# Altium PCB Eth_PoE.PcbDoc (part 2 of 3)
Units mm, origin at the board's own origin, x right, y up, seen from the top; angles counter-clockwise.
Board outline 33 x 53 mm, 2 copper layers (Top Layer, Bottom Layer), stack 0.97 mm thick; 81 components, 62 nets, 294 pads, 109 vias.
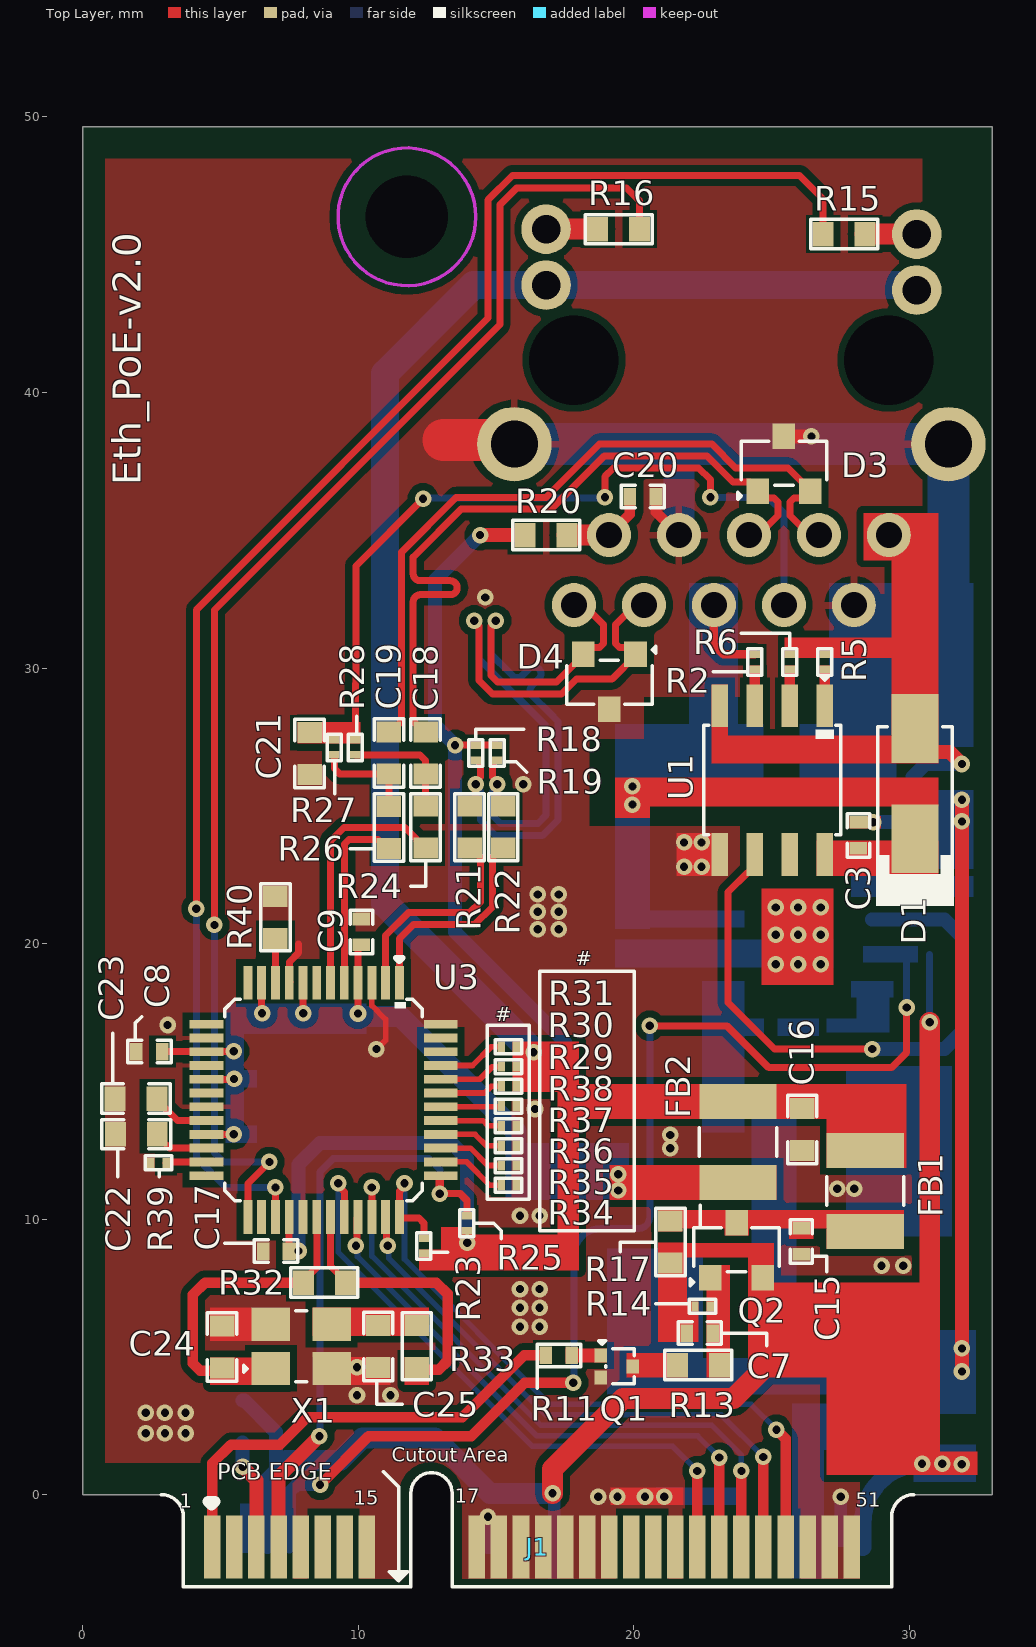
[diagram p0: Top Layer view]

## Part data (continued)
R13: library part RC0603FR-071KL, "RES SMD 1K OHM 1% 1/10W 0603", Case Code (Imperial)=0603, Case Code (Metric)=1608, LCSC Part Number=C22548, Manufacturer=Yageo, Max Operating Temperature=155°C, Min Operating Temperature=-55°C, Power Rating=100mW, Resistance=1kR, Supplier Part Number 1=311-1.00KHRDKR-ND, Temperature Coefficient=100ppm/°C, Tolerance=1%, Voltage Rating=50V, Case/Package=0603, ComponentLink1Description=https://www.verical.com/server-webapp/html/getDatasheet?partID=409289&src-supplier=Verical, ComponentLink1URL=https://www.verical.com/server-webapp/html/getDatasheet?partID=409289&src-supplier=Verical, ComponentLink2Description=http://documents.rs-components.com/techlib://itc_doclist_GB.htm?stockno=5048928&src-supplier=RSComponents, ComponentLink2URL=http://documents.rs-components.com/techlib://itc_doclist_GB.htm?stockno=5048928&src-supplier=RSComponents, ComponentLink3Description=http://www.yageo.com/documents/recent/PYu-RC0603_51_RoHS_L_4.pdf?src-supplier=Avnet+Europe, ComponentLink3URL=http://www.yageo.com/documents/recent/PYu-RC0603_51_RoHS_L_4.pdf?src-supplier=Avnet+Europe, ComponentLink4Description=http://www.farnell.com/datasheets/2167052.pdf?src-supplier=Element14, ComponentLink4URL=http://www.farnell.com/datasheets/2167052.pdf?src-supplier=Element14, ComponentLink5Description=http://www.farnell.com/datasheets/1868787.pdf?src-supplier=Element14, ComponentLink5URL=http://www.farnell.com/datasheets/1868787.pdf?src-supplier=Element14, ComponentLink6Description=http://www.yageo.com/documents/recent/PYu-RC_Group_51_RoHS_L_2.pdf?src-supplier=Avnet, ComponentLink6URL=http://www.yageo.com/documents/recent/PYu-RC_Group_51_RoHS_L_2.pdf?src-supplier=Avnet, ComponentLink7Description=https://www.verical.com/server-webapp/html/getDatasheet?partID=404327&src-supplier=Verical, ComponentLink7URL=https://www.verical.com/server-webapp/html/getDatasheet?partID=404327&src-supplier=Verical, ComponentLink8Description=http://www.farnell.com/datasheets/443971.pdf?src-supplier=Element14, ComponentLink8URL=http://www.farnell.com/datasheets/443971.pdf?src-supplier=Element14, Composition="Thick Film", Contact Plating=Tin,Matte, Depth=0.8mm, Height=0.45mm, Item Type=Resistor, Lead Free="Lead Free", Length=1.6mm, Manufacturer Part Number=RC0603FR-071KL, Military Standard=Not, Packaging="Tape and Reel", Pricing 1="1=0.1, 10=0.023, 100=0.0094, 1000=0.0042, 2500=0.0037 (USD)", Radiation Hardening=No, REACH SVHC="No SVHC", Stock 1=21472395, Supplier 1=Digi-Key, Termination=SMD/SMT
R15 R16: library part RC0603JR-07330RL, "RES  SMD 330R 100 mW 0603", Case Code (Imperial)=0603, Case Code (Metric)=1608, LCSC Part Number=C105879, Manufacturer=Yageo, Max Operating Temperature=155°C, Max Power Dissipation=100mW, Min Operating Temperature=-55°C, Package Quantity=5000, Resistance Tolerance=5%, Resistor Type="Thick Film", Supplier Part Number 1=311-330GRCT-ND, Temperature Coefficient=100ppm/°C, Voltage Rating=50V, Case/Package=0603, Category="Chip SMD Resistors", Construction=Rectangular, Depth=0.8mm, Features="Moisture Resistant", Height=0.45mm, Item Type=Resistor, Lead Free="Lead Free", Length=1.6mm, Manufacturer Part Number=RC0603JR-07330RL, Military Standard=Not, Number of Pins=2, Number of Terminations=2, Packaging="Tape and Reel", Power Rating=100mW, Pricing 1="1=0.10000, 10=0.02000, 100=0.00800, 1000=0.00360, 2500=0.00312 (USD)", REACH SVHC="No SVHC", Resistance=330R, RoHS=Yes, RoHS Compliant=Yes, Series=RC, Size Code=0603, Stock 1=1074593, Supplier 1=Digi-Key, Termination=SMD/SMT, Tolerance=5%, Voltage Rating (DC)=50V, Width=0.8mm
R18 R19 R27 R28: library part RC0201FR-0749R9L, "RES SMD 49.9 OHM 1% 1/20W 0201", Case Code (Imperial)=0201, Case Code (Metric)=0603, LCSC Part Number=C155744, Manufacturer=Yageo, Max Operating Temperature=125°C, Max Power Dissipation=50mW, Min Operating Temperature=-55°C, Resistor Type="Thick Film", Temperature Coefficient=200ppm/°C, Tolerance=1%, Voltage Rating=25V, Case/Package=0201, Category="Chip SMD Resistors", ComponentLink1Description=http://www.yageo.com/documents/recent/PYu-RC0201_51_RoHS_L_(8).pdf?src-supplier=Mouser, ComponentLink1URL=http://www.yageo.com/documents/recent/PYu-RC0201_51_RoHS_L_(8).pdf?src-supplier=Mouser, ComponentLink2Description=http://www.yageo.com/documents/recent/PYu-RC0201_51_RoHS_L_(8).pdf?src-supplier=Future+Electronics, ComponentLink2URL=http://www.yageo.com/documents/recent/PYu-RC0201_51_RoHS_L_(8).pdf?src-supplier=Future+Electronics, ComponentLink3Description=http://www.yageo.com/documents/recent/PYu-RC_Group_51_RoHS_L_10.pdf?src-supplier=Digi-Key, ComponentLink3URL=http://www.yageo.com/documents/recent/PYu-RC_Group_51_RoHS_L_10.pdf?src-supplier=Digi-Key, ComponentLink4Description=http://www.yageo.com/documents/recent/PYu-RC_Group_51_RoHS_L_9.pdf?src-supplier=Digi-Key, ComponentLink4URL=http://www.yageo.com/documents/recent/PYu-RC_Group_51_RoHS_L_9.pdf?src-supplier=Digi-Key, Construction=Rectangular, Depth=0.3mm, Features="Moisture Resistant", Height=0.01inch, Item Type=Resistor, Lead Free="Lead Free", Length=0.6mm, Manufacturer Part Number=RC0201FR-0749R9L, Military Standard=Not, Number of Terminations=2, Packaging="Tape and Reel", Power Rating=50mW, Pricing 1="10000=0.00128 (USD)", Resistance=49.9R, RoHS=Yes, RoHS Compliant=Yes, Series=RC, Size Code=0201, Stock 1=1020000, Supplier 1=Avnet, Supplier Part Number 1=RC0201FR-0749R9L, Termination=SMD/SMT, Width=0.012inch
R20: library part RC0603FR-0710RL, "RES SMD 10 OHM 1% 1/10W 0603", Case Code (Imperial)=0603, Case Code (Metric)=1608, LCSC Part Number=C109318, Manufacturer=Yageo, Max Operating Temperature=155°C, Min Operating Temperature=-55°C, Power Rating=100mW, Supplier Part Number 1=311-10.0HRDKR-ND, Temperature Coefficient=200ppm/°C, Tolerance=1%, Voltage Rating=50V, Case/Package=0603, ComponentLink1Description=http://www.farnell.com/datasheets/1868787.pdf?src-supplier=Element14, ComponentLink1URL=http://www.farnell.com/datasheets/1868787.pdf?src-supplier=Element14, ComponentLink2Description=http://www.yageo.com/documents/recent/PYu-RC0603_51_RoHS_L_4.pdf?src-supplier=Avnet, ComponentLink2URL=http://www.yageo.com/documents/recent/PYu-RC0603_51_RoHS_L_4.pdf?src-supplier=Avnet, ComponentLink3Description=http://documents.rs-components.com/techlib://itc_doclist_GB.htm?stockno=5048984&src-supplier=RSComponents, ComponentLink3URL=http://documents.rs-components.com/techlib://itc_doclist_GB.htm?stockno=5048984&src-supplier=RSComponents, ComponentLink4Description=http://www.yageo.com/documents/recent/PYu-RC0603_51_RoHS_L_4.pdf?src-supplier=Avnet+Europe, ComponentLink4URL=http://www.yageo.com/documents/recent/PYu-RC0603_51_RoHS_L_4.pdf?src-supplier=Avnet+Europe, Composition="Thick Film", Contact Plating=Tin,Matte, Depth=0.8mm, Height=0.45mm, Item Type=Resistor, Lead Free="Lead Free", Length=1.6mm, Manufacturer Part Number=RC0603FR-0710RL, Military Standard=Not, Number of Pins=2, Packaging="Tape and Reel", Pricing 1="1=0.1, 10=0.046, 100=0.0187, 1000=0.0084, 2500=0.00729 (USD)", Radiation Hardening=No, REACH SVHC="No SVHC", Resistance=10R, Stock 1=10836596, Supplier 1=Digi-Key, Termination=SMD/SMT, Voltage Rating (DC)=50V, Width=0.8mm
R21 R22 R24 R26: library part RC0603FR-0733RL, "RES SMD 0603 33 Ohm 1% 1/10W", Case Code (Imperial)=0603, Case Code (Metric)=1608, LCSC Part Number=C108661, Manufacturer=Yageo, Max Operating Temperature=155°C, Max Power Dissipation=100mW, Min Operating Temperature=-55°C, Package Quantity=1, Resistance Tolerance=1%, Resistor Type="Thick Film", Supplier Part Number 1=311-33.0HRCT-ND, Temperature Coefficient=100ppm/°C, Voltage Rating=75V, Voltage Rating (DC)=50V, Case/Package=0603, Category="Chip SMD Resistors", ComponentLink1Description=https://datasheet.ciiva.com/11808/0900766b80f96399-11808741.pdf?src-supplier=RSComponents, ComponentLink1URL=https://datasheet.ciiva.com/11808/0900766b80f96399-11808741.pdf?src-supplier=RSComponents, ComponentLink2Description=https://datasheet.ciiva.com/2453/pyu-r-int-thick-7-2453952.pdf?src-supplier=Digi-Key, ComponentLink2URL=https://datasheet.ciiva.com/2453/pyu-r-int-thick-7-2453952.pdf?src-supplier=Digi-Key, ComponentLink3Description=https://datasheet.ciiva.com/2453/pyu-r-int-thick-7-2453953.pdf?src-supplier=Digi-Key, ComponentLink3URL=https://datasheet.ciiva.com/2453/pyu-r-int-thick-7-2453953.pdf?src-supplier=Digi-Key, ComponentLink4Description=https://datasheet.ciiva.com/2453/pyu-r-int-thick-7-2453954.pdf?src-supplier=Digi-Key, ComponentLink4URL=https://datasheet.ciiva.com/2453/pyu-r-int-thick-7-2453954.pdf?src-supplier=Digi-Key, ComponentLink5Description=https://datasheet.ciiva.com/7660/38590-7660792.pdf?src-supplier=Element14, ComponentLink5URL=https://datasheet.ciiva.com/7660/38590-7660792.pdf?src-supplier=Element14, ComponentLink6Description=https://datasheet.ciiva.com/15189/getdatasheetpartid-326673-15189708.pdf?src-supplier=Verical, ComponentLink6URL=https://datasheet.ciiva.com/15189/getdatasheetpartid-326673-15189708.pdf?src-supplier=Verical, ComponentLink7Description=https://datasheet.ciiva.com/7746/443971-7746334.pdf?src-supplier=Element14, ComponentLink7URL=https://datasheet.ciiva.com/7746/443971-7746334.pdf?src-supplier=Element14, ComponentLink8Description=https://datasheet.ciiva.com/7746/443971-7746335.pdf?src-supplier=Element14, ComponentLink8URL=https://datasheet.ciiva.com/7746/443971-7746335.pdf?src-supplier=Element14, ComponentLink9Description=https://datasheet.ciiva.com/46395/443971-46395007.pdf?src-supplier=Element14, ComponentLink9URL=https://datasheet.ciiva.com/46395/443971-46395007.pdf?src-supplier=Element14, Construction=Rectangular, Depth=0.8mm, Features="Moisture Resistant", Height=0.45mm, Item Type=Resistor, Lead Free="Lead Free", Lead Pitch=0.3mm, Length=1.6mm, Manufacturer Part Number=RC0603FR-0733RL, Military Standard=Not, Number of Pins=2, Number of Terminations=2, Packaging="Tape and Reel", Power Rating=100mW, Pricing 1="1=0.10000, 10=0.02400, 100=0.00970, 1000=0.00436, 2500=0.00378 (USD)", REACH SVHC="No SVHC", Resistance=33R, RoHS=Yes, RoHS Compliant=Yes, Series=RC, Size Code=0603, Stock 1=41, Supplier 1=Digi-Key, Technology="THICK FILM", Termination=SMD/SMT, Tolerance=1%, Weight=7.1E-05oz, Width=0.8mm
R32: library part RC0603FR-071ML, "RES SMD 1M OHM 1% 1/10W 0603", Case Code (Imperial)=0603, Case Code (Metric)=1608, LCSC Part Number=C105578, Manufacturer=Yageo, Max Operating Temperature=155°C, Min Operating Temperature=-55°C, Package Quantity=5000, Power Rating=100mW, Resistance=1MR, Supplier Part Number 1=311-1.00MHRDKR-ND, Temperature Coefficient=100ppm/°C, Tolerance=1%, Voltage Rating=50V, Case/Package=0603, ComponentLink1Description=http://www.farnell.com/datasheets/2167052.pdf?src-supplier=Mouser, ComponentLink1URL=http://www.farnell.com/datasheets/2167052.pdf?src-supplier=Mouser, ComponentLink2Description=http://www.farnell.com/datasheets/2167052.pdf?src-supplier=Element14, ComponentLink2URL=http://www.farnell.com/datasheets/2167052.pdf?src-supplier=Element14, ComponentLink3Description=http://documents.rs-components.com/techlib://itc_doclist_GB.htm?stockno=5048956&src-supplier=RSComponents, ComponentLink3URL=http://documents.rs-components.com/techlib://itc_doclist_GB.htm?stockno=5048956&src-supplier=RSComponents, Composition="Thick Film", Depth=0.8mm, Height=0.45mm, Lead Free="Lead Free", Length=1.6mm, Manufacturer Part Number=RC0603FR-071ML, Military Standard=Not, Number of Pins=2, Packaging="Tape and Reel", Pricing 1="1=0.1, 10=0.023, 100=0.0094, 1000=0.00421, 2500=0.00366 (USD)", REACH SVHC="No SVHC", Stock 1=3824601, Supplier 1=Digi-Key, Termination=SMD/SMT, Voltage Rating (DC)=50V, Width=0.8mm
R40: library part RC0603FR-0712K4L, "RES SMD 12.4K OHM 1% 1/10W 0603", Case Code (Imperial)=0603, Case Code (Metric)=1608, LCSC Part Number=C137798, Manufacturer=Yageo, Max Operating Temperature=155°C, Max Power Dissipation=100mW, Min Operating Temperature=-55°C, Package Quantity=1, Resistance=12.4kR, Resistor Type="Thick Film", Supplier Part Number 1=311-12.4KHRCT-ND, Temperature Coefficient=100ppm/°C, Tolerance=1%, Voltage Rating=50V, Working Voltage=75V, Case/Package=0603, Category="Chip SMD Resistors", ComponentLink1Description=https://datasheet.ciiva.com/2454/pyu-r-int-thick-7-2454069.pdf?src-supplier=Digi-Key, ComponentLink1URL=https://datasheet.ciiva.com/2454/pyu-r-int-thick-7-2454069.pdf?src-supplier=Digi-Key, ComponentLink2Description=https://datasheet.ciiva.com/2454/pyu-r-int-thick-7-2454070.pdf?src-supplier=Digi-Key, ComponentLink2URL=https://datasheet.ciiva.com/2454/pyu-r-int-thick-7-2454070.pdf?src-supplier=Digi-Key, ComponentLink3Description=https://datasheet.ciiva.com/2454/pyu-r-int-thick-7-2454071.pdf?src-supplier=Digi-Key, ComponentLink3URL=https://datasheet.ciiva.com/2454/pyu-r-int-thick-7-2454071.pdf?src-supplier=Digi-Key, Construction=Rectangular, Depth=0.8mm, Features="Moisture Resistant", Height=0.022inch, Lead Free="Lead Free", Length=0.063inch, Manufacturer Part Number=RC0603FR-0712K4L, Military Standard=Not, Number of Terminations=2, Packaging="Tape and Reel", Power Rating=100mW, Pricing 1="1=0.10000, 10=0.02400, 100=0.00970, 1000=0.00436, 2500=0.00378 (USD)", RoHS=Yes, RoHS Compliant=Yes, Series=RC, Stock 1=494008, Supplier 1=Digi-Key, Technology="THICK FILM", Termination=SMD/SMT, Voltage Rating (DC)=50V, Width=0.031inch
U1: "IC POE CNTRL 1 CHANNEL 8SOIC", Case/Package=D, LCSC Part Number=C2867397, Manufacturer="Texas Instruments", Max Operating Temperature=85°C, Max Power Dissipation=12.95W, Max Supply Voltage=57V, Min Current Limit=405mA, Min Operating Temperature=-40°C, Min Supply Voltage=0V, Operating Supply Current=240uA, Output Current=450mA, Package Quantity=2500, Power Dissipation=13W, Supplier Part Number 1=595-TPS2375DR, Category="Interface ICs", ComponentLink1Description=https://datasheet.ciiva.com/1943/tps2375-1943071.pdf?src-supplier=Digi-Key, ComponentLink1URL=https://datasheet.ciiva.com/1943/tps2375-1943071.pdf?src-supplier=Digi-Key, ComponentLink2Description=https://datasheet.ciiva.com/1943/tps2375-1943070.pdf?src-supplier=Digi-Key, ComponentLink2URL=https://datasheet.ciiva.com/1943/tps2375-1943070.pdf?src-supplier=Digi-Key, ComponentLink3Description=https://datasheet.ciiva.com/1943/tps2375-1943072.pdf?src-supplier=Digi-Key, ComponentLink3URL=https://datasheet.ciiva.com/1943/tps2375-1943072.pdf?src-supplier=Digi-Key, ComponentLink4Description=https://datasheet.ciiva.com/14248/tps2375-14248055.pdf?src-supplier=Avnet, ComponentLink4URL=https://datasheet.ciiva.com/14248/tps2375-14248055.pdf?src-supplier=Avnet, Height=1.58mm, Item Type=IC, Lead Free="Lead Free", Length=5mm, Manufacturer Part Number=TPS2375DR, Number of Channels=1, Packaging="Tape and Reel", Pins=8, Pricing 1="1=2.94, 10=2.65, 50=2.5, 100=2.13, 1000=1.45, 10000=1.29 (USD)", Radiation Hardening=No, RoHS=Yes, RoHS Compliant=Yes, Series=-, Stock 1=12566, Supplier 1=Mouser, Weight=0.002561oz
U2: "Step-down type SOIC-8-EP DC-DC Converters ROHS", LCSC Part Number=C329267, Manufacturer=XDS, Package=SOIC-8-EP, ComponentLink1Description=LCSC, ComponentLink1URL=https://www.lcsc.com/product-detail/DC-DC-Converters_XDS-TX4138_C329267.html, Item Type=IC, Manufacturer Part Number=TX4138
U3: "SPI LQFP-48(7x7) Ethernet ICs ROHS", LCSC Part Number=C32843, Manufacturer=WIZNET, Package=LQFP-48(7x7), ComponentLink1Description=LCSC, ComponentLink1URL=https://www.lcsc.com/product-detail/Ethernet-ICs_WIZNET-W5500_C32843.html, Item Type=IC, Manufacturer Part Number=W5500
X1: library part NX3225GA-25MHZ-STD-CRG-2, "SMD3225-4P Crystals ROHS", LCSC Part Number=C438901, Manufacturer=NDK, Package=SMD3225-4P, ComponentLink1Description=LCSC, ComponentLink1URL=https://www.lcsc.com/product-detail/Crystals_NDK-NX3225GA-25MHZ-STD-CRG-2_C438901.html, Item Type=Crystal, Manufacturer Part Number=NX3225GA-25MHZ-STD-CRG-2

## Free pads (board coordinates)
  round 0 hole 3 unplated: MH(11.759,46.376)

## Via types
v1: diameter 0.6, hole 0.3, Top Layer to Bottom Layer, 109 vias

## Nets (pads, with @x,y where several pads share a name; then routed paths per layer and width w, separated by ;. In a path a pad name is that pad's centre, name@x,y a point inside that pad or via, vN(x,y) a via of type N, cw(c..) or ccw(c..) an arc to the next point about the centre after c; other vN are vias at no path point)
3V3: C7.2 J1.6 J1.24 J1.52 Q2.2 R10.2 R12.2 R14.1 R17.2 | length 47.2
  Top Layer w0.203: R17.2@21.321,8.405 21.787,8.872
  Top Layer w0.508: 24.296,8.872 24.673,8.494
  Top Layer w0.762: v1(17.046,0.051) 17.046,0.939 19.603,3.497 23.62,3.497 24.739,4.615 ; 28.244,3.565 28.707,4.028 ; 30.081,6.25 30.734,6.903 v1(30.734,17.145)
  Bottom Layer w0.203: R10.2@30.73,19.609 R10.2@30.732,19.607
  Bottom Layer w0.254: v1@30.732,17.145 R10.2@30.732,19.607
  Bottom Layer w0.508: R12.2@5.8,3.417 5.863,3.417 7,2.281 7,0.878 ; J1.6@6.7,-1.9 6.7,0.578 7,0.878 ; 7.366,1.245 7,0.878
  Bottom Layer w0.635: J1.52@28.3,-1.9 28.3,-1.037 cw(c30.455,-1.037) v1(30.455,1.118)
  Bottom Layer w0.762: 7.366,1.245 9.332,1.245 10.145,2.057 12.776,2.057 14.783,0.051 v1(17.046,0.051)
  other v1: 31.898,1.102 31.188,1.118
ACTLED: R15.2 U3.27 | length 57.7
  Top Layer w0.254: v1(4.115,21.26) 4.115,32.106 14.706,42.697 14.706,46.994 15.591,47.879 26.01,47.879 26.864,47.025 R15.2@26.864,45.746 ; U3.27@6.988,10.076 v1(6.988,11.151)
  Bottom Layer w0.254: v1(4.115,21.26) 4.115,12.232 5.196,11.151 v1(6.988,11.151) v1@7.023,11.151
CT_R: C21.2 J2.4 R27.1 R28.1 | length 29.9
  Top Layer w0.254: C21.2@8.23,27.661 8.293,27.661 8.556,27.398 R27.1@9.126,27.398 R28.1@9.888,27.398 9.888,29.446 9.906,29.464 9.906,33.706 v1(12.344,36.144) ; v1(18.947,36.195) 18.947,36.96 19.25,37.262 22.348,37.262 22.774,36.837 v1(22.774,36.195)
  Bottom Layer w0.254: v1(12.344,36.144) 12.37,36.17 18.922,36.17 v1(18.947,36.195) ; v1(22.774,36.195) 24.867,36.195 25.441,35.621 J2.4@25.441,32.286
CT_T: C20.2 J2.9 R20.1 | length 3.2
  Top Layer w0.381: J2.9@19.091,34.826 19.85,35.585 C20.2@19.85,36.22
  Top Layer w0.762: R20.1@17.577,34.826 J2.9@19.091,34.826
DCDC_POK: J1.8 R10.1 U2.7 | length 42.8
  Top Layer w0.254: v1(20.574,17.018) 23.368,17.018 24.892,15.494 29.351,15.494 29.896,16.039 v1(29.896,17.681)
  Top Layer w0.381: v1(8.609,0.36) 10.366,2.118 14.088,2.118 16.034,4.064 v1(17.8,4.064)
  Bottom Layer w0.203: 29.86,19.609 29.896,19.572
  Bottom Layer w0.254: v1(17.8,4.064) 17.826,4.09 17.826,8.7 cw(c18.778,8.7) 18.778,9.652 20.137,9.652 ccw(c20.137,10.089) 20.574,10.089 v1(20.574,17.018) ; v1(29.896,17.681) 29.896,19.572
  Bottom Layer w0.457: J1.8@7.5,-1.9 7.5,0.093 7.767,0.36 v1(8.609,0.36)
FB: C4.1 R8.1 R9.2 U2.5